# Altium PCB DC-DC_Isolation.PcbDoc
Units mm, origin at the board's own origin, x right, y up, seen from the top; angles counter-clockwise.
Board outline 75 x 57 mm, 2 copper layers (Top Layer, Bottom Layer), stack 0.871 mm thick; 96 components, 45 nets, 238 pads, 57 vias.
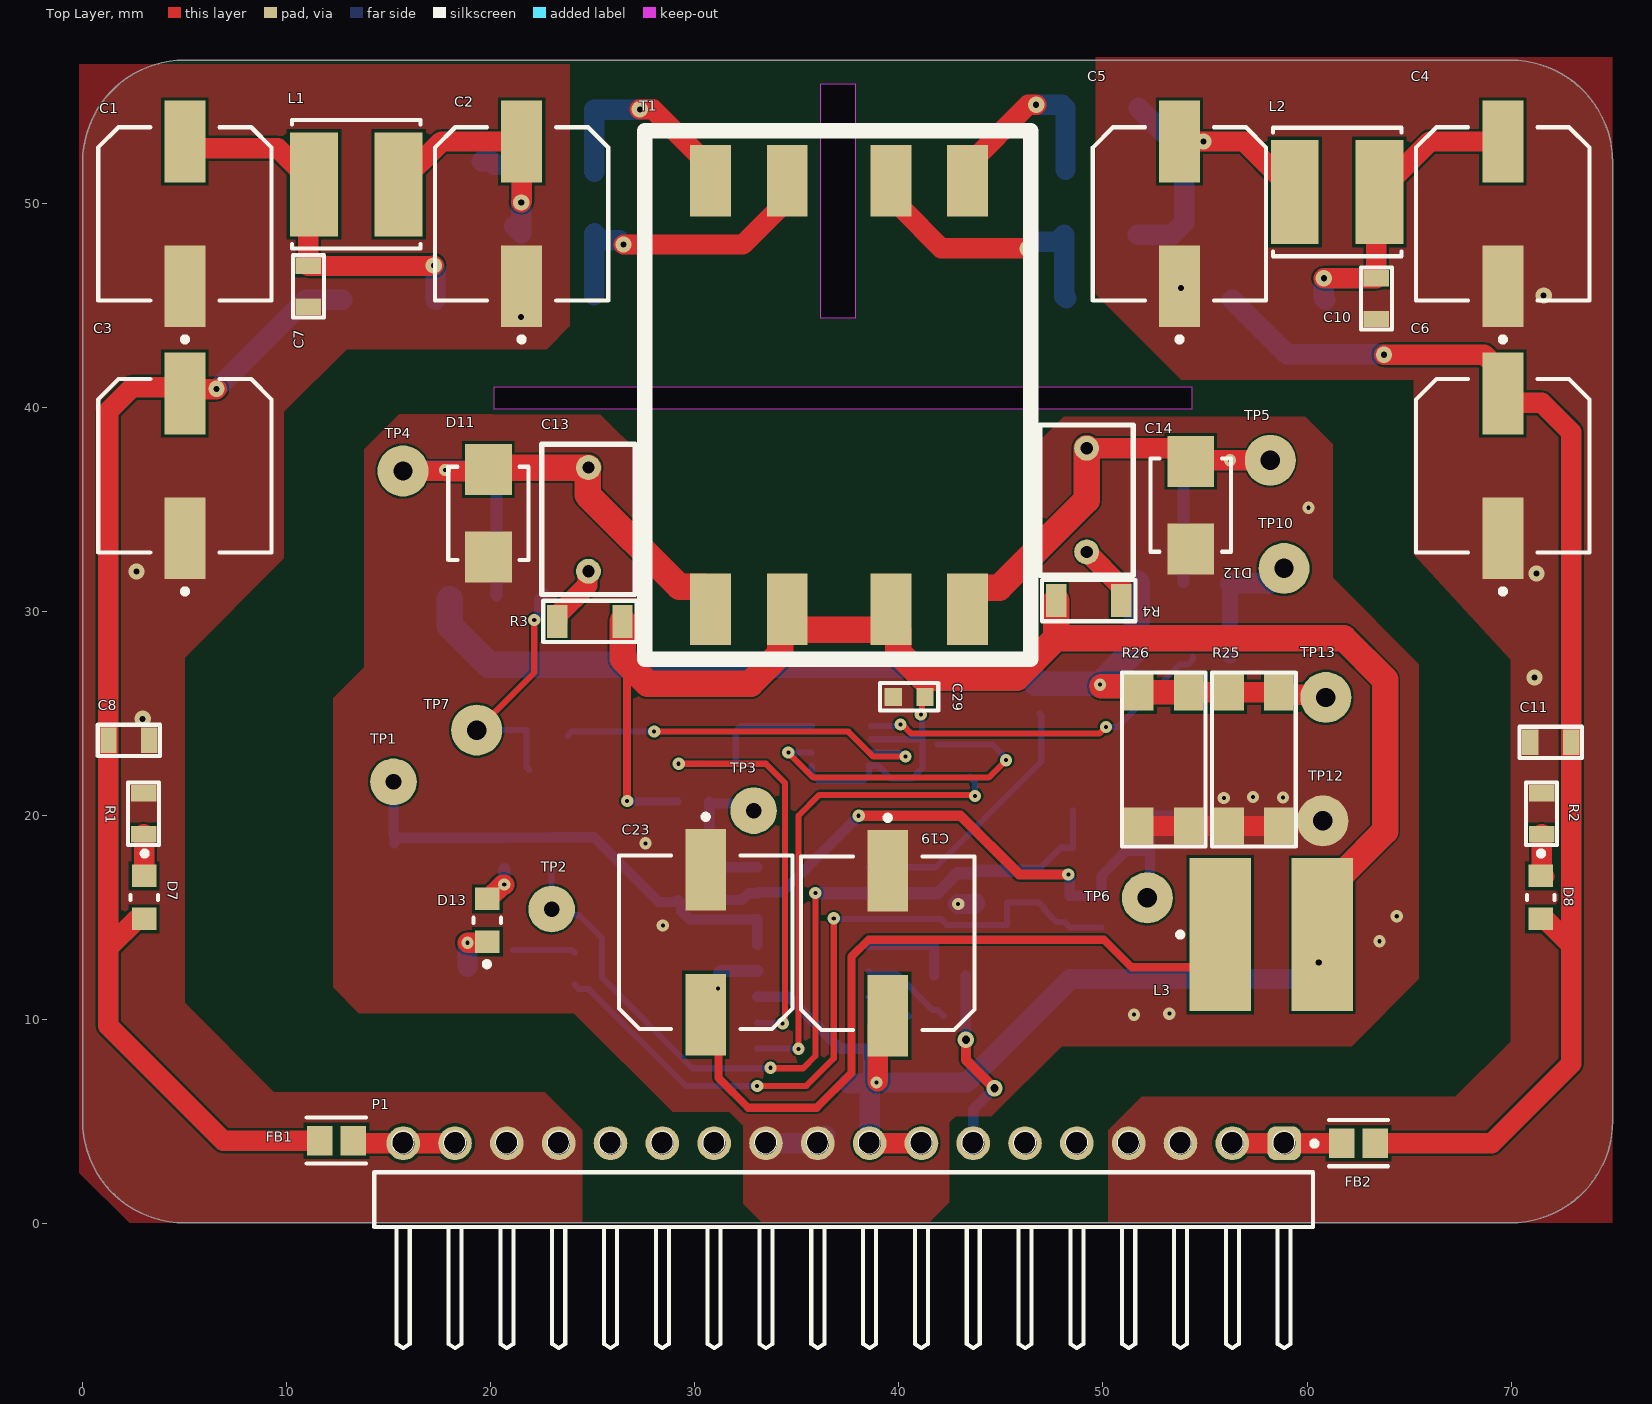
[diagram p0: Top Layer view]
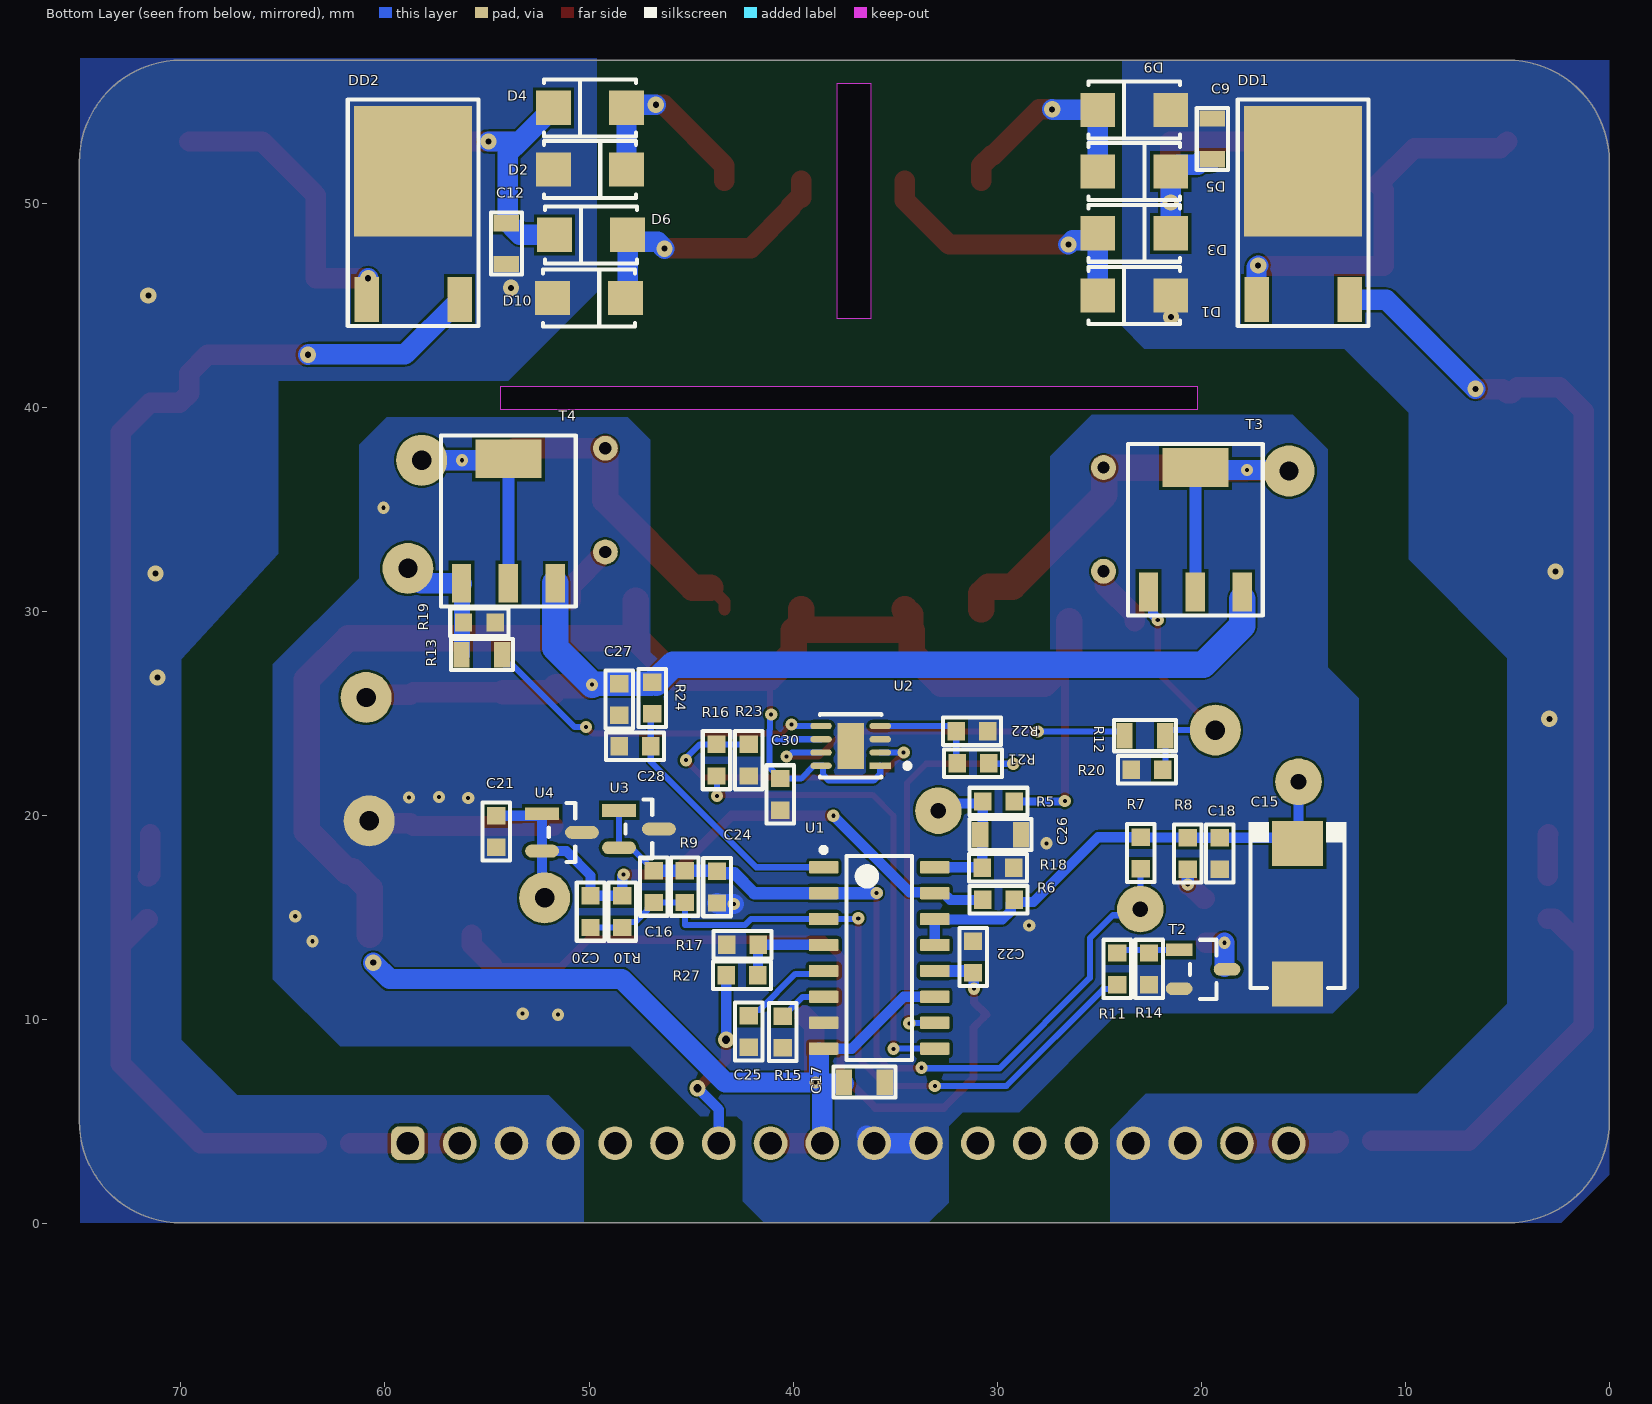
[diagram p1: Bottom Layer view, seen from below]
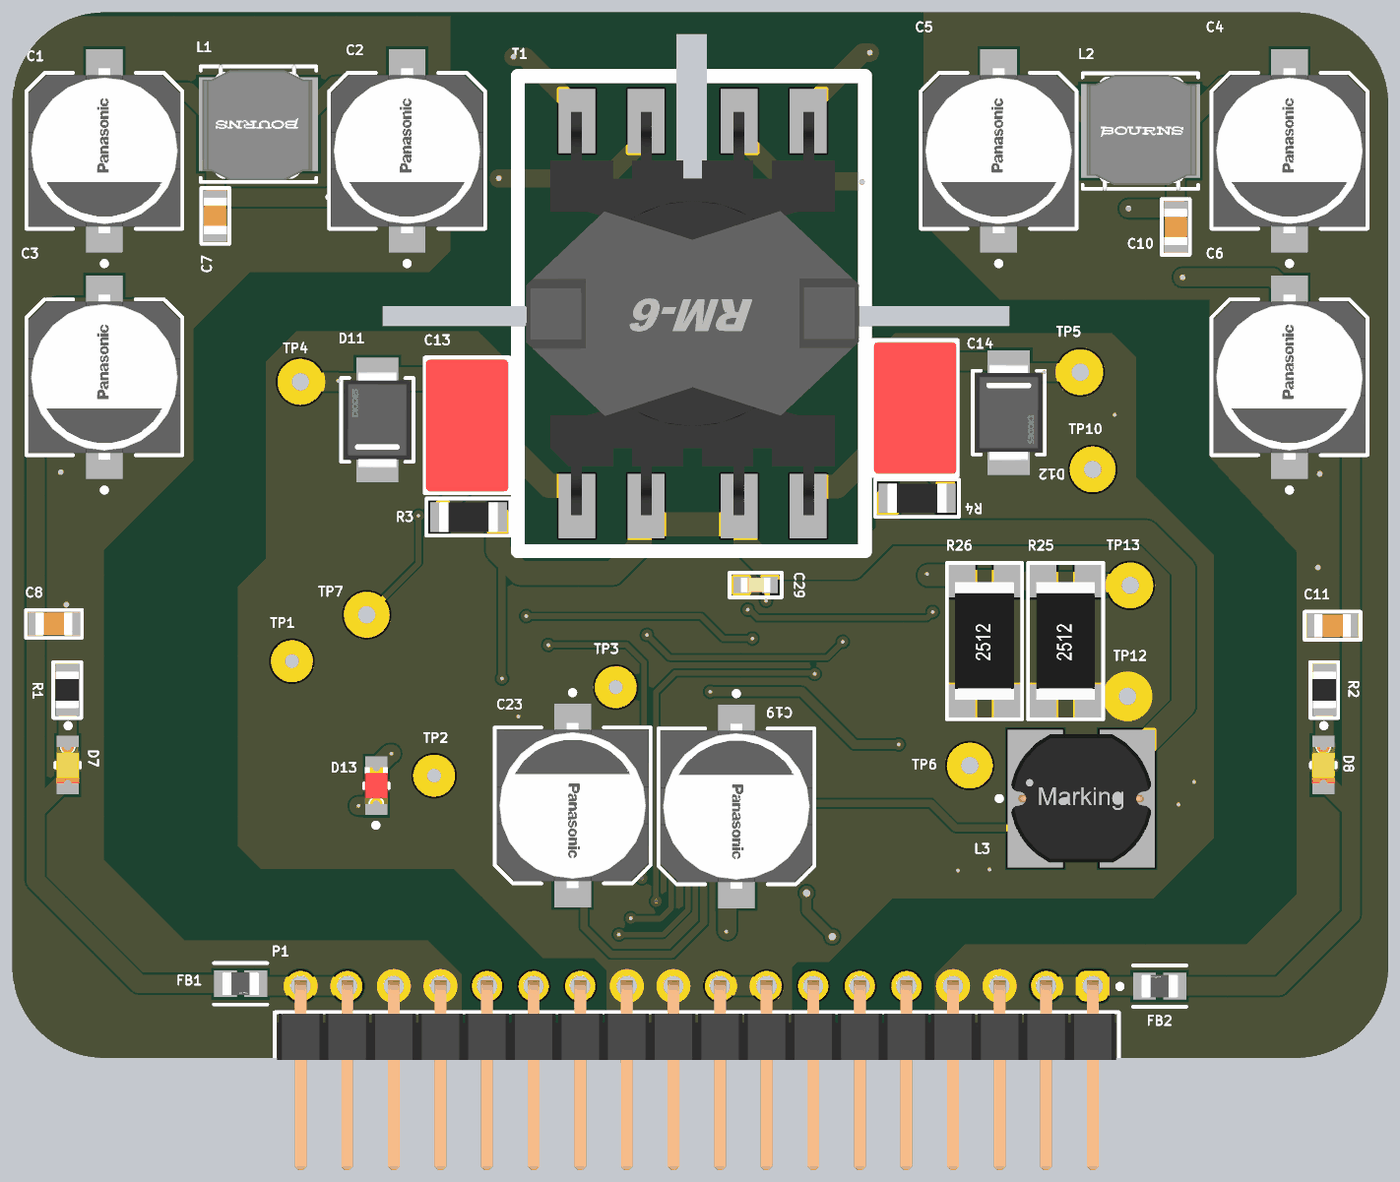
[diagram p2: 3D render of the assembled board from above, using the file's embedded part models]
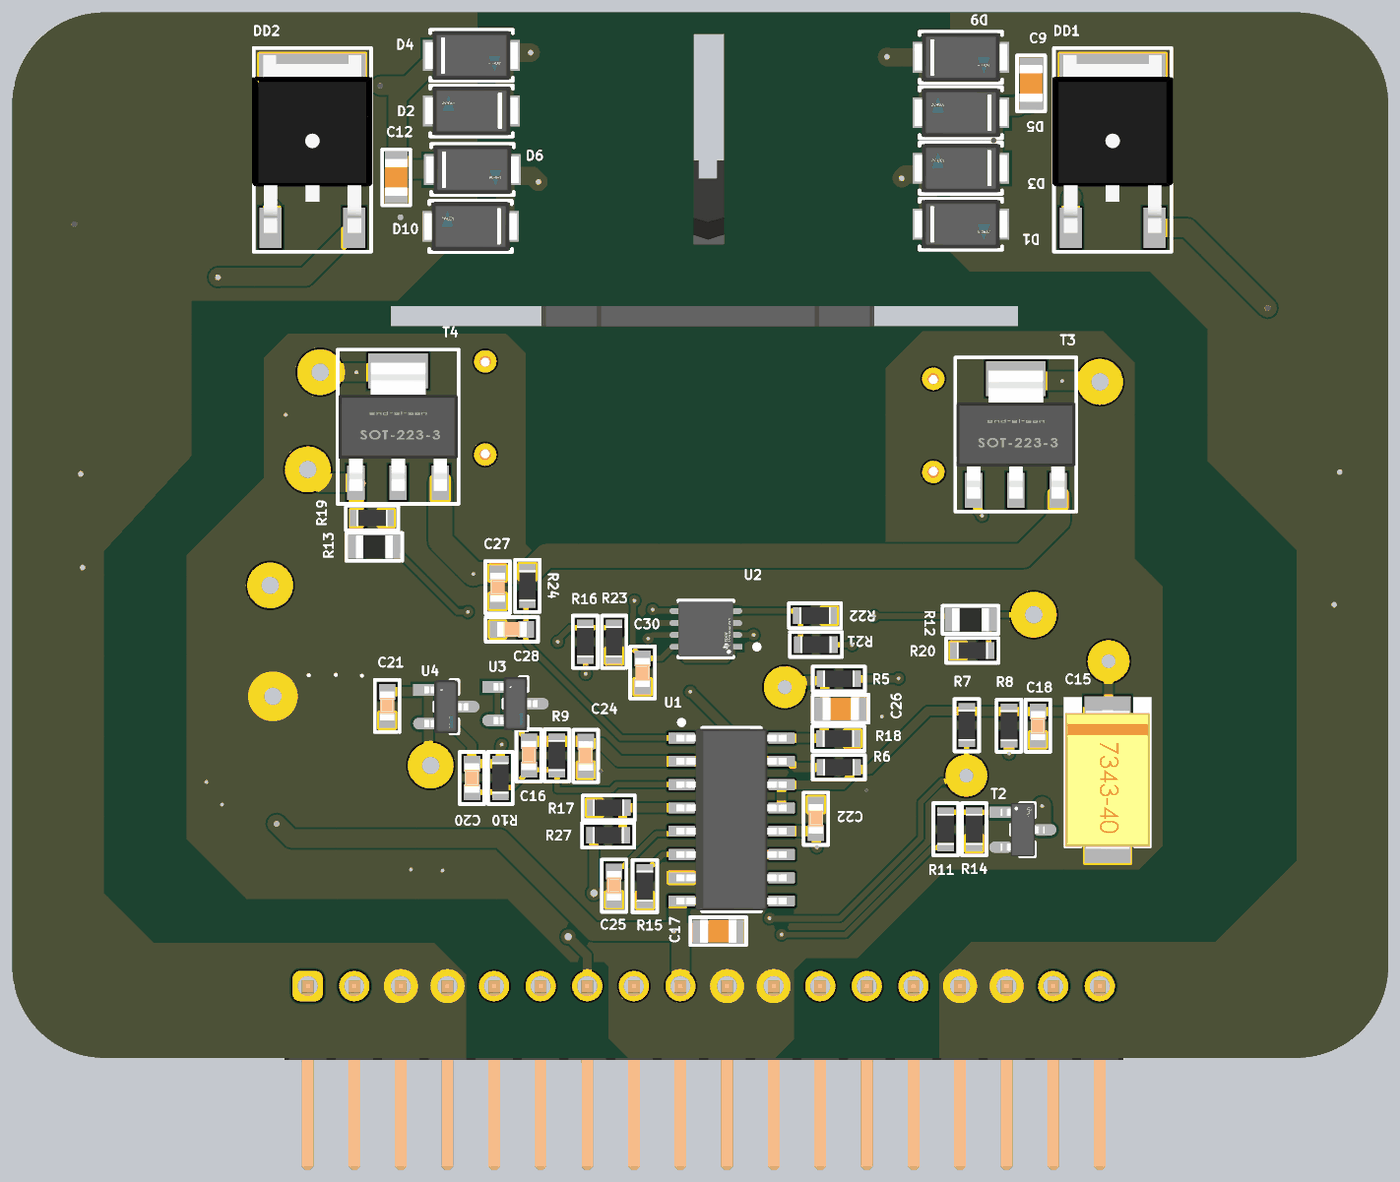
[diagram p3: 3D render of the assembled board from below, using the file's embedded part models]

## Layer stack, top to bottom
Top Solder: solder mask 0.0102, Solder Resist, Dk 3.5
Top Layer: signal copper 0.0356
Dielectric 1: dielectric 0.8, FR-4, Dk 4.8
Bottom Layer: signal copper 0.0356
Bottom Solder: solder mask 0.0102, Solder Resist, Dk 3.5

## Board outline
-0.019,5.04 -0.019,52.04 cw(c4.981,52.04) 4.981,57.04 69.981,57.04 cw(c69.981,52.04) 74.981,52.04 74.981,5.04 cw(c69.983,5.039) 69.981,0.04 4.981,0.04 cw(c4.98,5.039)
cut-out: 36.17,44.399 36.17,55.88 37.846,55.88 37.846,44.399
cut-out: 20.15,39.925 20.15,41.025 54.35,41.025 54.35,39.925

## Design rules (kind name [scope] priority, off if disabled: settings)
Clearance [All] p1: gap=0.254 ignorepadtopadclearanceinfootprint=FALSE except(0: Arc-Hole Track-Hole SMDPad-Hole THPad-Hole Via-Hole Fill-Hole Poly-Hole Region-Hole Text-Hole; 0.1: Arc-Poly Track-Poly THPad-Poly Via-Poly Fill-Poly Poly-Poly; 0.15: SMDPad-Poly)
Height [All] p1: minheight=0 maxheight=101.6 prefheight=12.7
PlaneConnect [All] p1: planeconnectstyle=Direct reliefexpansion=0.508 reliefentries=4 reliefconductorwidth=0.254 reliefairgap=0.254
PolygonConnect [All] p1: connectstyle=Direct reliefconductorwidth=0.254 reliefentries=4 polygonreliefangle="90 Angle" airgapwidth=0.254
RoutingVias [All] p1: holewidth=0.3 width=0.8 viastyle="Through Hole" minholewidth=0.2 minwidth=0.5 maxholewidth=0.4 maxwidth=1
SilkToSolderMaskClearance [IsPad] p1: minsilkscreentomaskgap=0.1 clearancetoexposedcopper=TRUE
SolderMaskExpansion [All] p1: expansion=0.102 istentingtop=FALSE
SupplyNets "Schematic Supply Nets_1" [InNet('GND')] p1: voltage=0.000
SupplyNets "Schematic Supply Nets" [InNet('VCC')] p2: voltage=0.000
Width [All] p1: maxlimit=3 minlimit=0.254 preferedwidth=0.5 minimp=50.000000 maximp=50.000000 favimp=50.000000
27 further rules are at their usual default settings.

## Components (designator, comment, footprint, x,y, rotation, side; value= is the part's Value field where it differs from the comment)
C1 "50V_100uF" CAP_SMD_Size_G 5,49.5 r90 top locked
C2 "50V_100uF" CAP_SMD_Size_G 21.5,49.5 r90 top locked
C3 "330uF_25V" CAP_SMD_Size_G 5,37.15 r90 top locked
C4 "50V_100uF" CAP_SMD_Size_G 69.6,49.5 r90 top locked
C5 "50V_100uF" CAP_SMD_Size_G 53.75,49.5 r90 top
C6 "330uF_25V" CAP_SMD_Size_G 69.6,37.15 r90 top locked
C7 "0.1uF" CAP-0805 11.05,45.95 r90 top
C8 "0.1uF" CAP-0805 2.25,23.7 r180 top
C9 "0.1uF" CAP-0805 19.45,53.175 r270 bottom
C10 "0.1uF" CAP-0805 63.4,45.35 r90 top
C11 "0.1uF" CAP-0805 71.95,23.6 r0 top
C12 "0.1uF" CAP-0805 54.05,48.05 r90 bottom
C13 "63V 0.01UF" FKP2D011001A00JSSD 24.775,34.525 r90 top
C14 "63V 0.01UF" FKP2D011001A00JSSD 49.2,35.475 r90 top
C15 "100uF_16V" CAP-TAN-D 15.275,15.2 r270 bottom
C16 "100nF" CAP-0603 46.825,16.525 r90 bottom
C17 "0.01uF" CAP-0805 36.5,6.942 r0 bottom
C18 "0.1uF" CAP-0603 19.075,18.15 r90 bottom
C19 "330uF_25V" CAP_SMD_Size_G 39.45,13.75 r270 top
C20 "100nF" CAP-0603 49.925,15.3 r270 bottom
C21 "100nF" CAP-0603 54.55,19.225 r90 bottom
C22 "0.01uF" CAP-0603 31.175,13.075 r270 bottom
C23 "470uF_25V" CAP_SMD_Size_G 30.525,13.8 r270 top
C24 "100nF" CAP-0603 43.725,16.5 r90 bottom
C25 "2.2nF" CAP-0603 42.175,9.425 r90 bottom
C26 "100nF" CAP-0805 29.825,19.075 r0 bottom
C27 "0.47uF" CAP-0603 48.525,25.7 r90 bottom
C28 "470 pF" CAP-0603 47.75,23.4 r180 bottom
C29 "0.1uF" CAP-0603 40.5,25.825 r0 top
C30 "0.01uF" CAP-0603 40.625,21.05 r90 bottom
D1 "ES1D-M3" FP-SMA-MFG 23.275,45.5 r180 bottom
D2 "ES1D-M3" FP-SMA-MFG 49.95,51.675 r0 bottom
D3 "ES1D-M3" FP-SMA-MFG 23.275,48.55 r0 bottom
D4 "ES1D-M3" FP-SMA-MFG 49.95,54.7 r180 bottom
D5 "ES1D-M3" FP-SMA-MFG 23.275,51.575 r0 bottom
D6 "ES1D-M3" FP-SMA-MFG 49.9,48.475 r180 bottom
D7 "LED_GREEN" LED_GREEN 3,16 r270 top locked
D8 "LED_GREEN" LED_GREEN 71.45,16 r270 top locked
D9 "ES1D-M3" FP-SMA-MFG 23.275,54.6 r180 bottom
D10 "ES1D-M3" FP-SMA-MFG 50,45.375 r0 bottom
D11 "SMBJ33CA-13-F" FP-SMB-CA-MFG 19.875,34.825 r90 top
D12 "SMBJ33CA-13-F" FP-SMB-CA-MFG 54.3,35.225 r270 top
D13 "LED_RED" LED_RED 19.825,14.875 r90 top
DD1 "LM7818" TO-252 15,49.5 r180 bottom locked
DD2 "LM7818" TO-252 58.625,49.5 r180 bottom locked
FB1 "BLM21PG221SN1D" FP-BLM21-0_2-t0_85-e0_5-IPC_B 12.425,4.075 r0 top
FB2 "BLM21PG221SN1D" FP-BLM21-0_2-t0_85-e0_5-IPC_B 62.524,3.95 r180 top
L1 "SRN6045TA-220M" FP-SRN6045TA-MFG 13.4,50.95 r180 top
L2 "SRN6045TA-220M" FP-SRN6045TA-MFG 61.475,50.575 r0 top
L3 "330µH, 0.38A" WE-PD2_7850 58.25,14.175 r0 top
P1 "61301811021" 61301811021 37.29,1.18 r0 top
R1 "10K" RES-0805 2.975,20.1 r270 top
R2 "10K" RES-0805 71.5,20.1 r270 top
R3 "10 OMH" RES-1206 24.85,29.525 r180 top
R4 "10 OMH" RES-1206 49.3,30.55 r180 top
R5 "10K" RES-0603 29.925,20.7 r180 bottom
R6 "2K" RES-0603 29.925,15.875 r180 bottom
R7 "2K" RES-0603 22.95,18.175 r90 bottom
R8 "820" RES-0603 20.65,18.15 r90 bottom
R9 "200K" RES-0603 45.3,16.525 r90 bottom
R10 "200K" RES-0603 48.375,15.3 r270 bottom
R11 "1K" RES-0603 24.1,12.5 r270 bottom
R12 "10" RES-0805 22.75,23.925 r180 bottom
R13 "10" RES-0805 55.25,27.9 r0 bottom
R14 "10K" RES-0603 22.55,12.5 r90 bottom
R15 "6.2K" RES-0603 40.5,9.4 r90 bottom
R16 "10" RES-0603 43.75,22.725 r90 bottom
R17 "10K" RES-0603 42.475,13.675 r180 bottom
R18 "2K" RES-0603 29.95,17.45 r0 bottom
R19 "1K" RES-0603 55.375,29.475 r0 bottom
R20 "1K" RES-0603 22.65,22.25 r180 bottom
R21 "10" RES-0603 31.175,22.575 r0 bottom
R22 "1K" RES-0603 31.225,24.15 r0 bottom
R23 "1K" RES-0603 42.175,22.725 r90 bottom
R24 "1K" RES-0603 46.9,25.775 r90 bottom
R25 "1" RES-2512 57.4,22.775 r90 top
R26 "1" RES-2512 52.975,22.775 r90 top
R27 "1K" RES-0603 42.5,12.175 r0 bottom
T1 "RM-6" TRANS_RM6 37.065,40.625 r90 top
T2 "BC847C" SOT23-3_IPC_A 19.9,12.475 r180 bottom
T3 "IRFL024ZTRPBF" SOT-223-3 20.275,34.025 r180 bottom
T4 "IRFL024ZTRPBF" SOT-223-3 53.95,34.45 r180 bottom
TP1 "Test_Point_PCB" Test_Point#1 15.222,21.666 r0 top
TP2 "Test_Point_PCB" Test_Point#1 22.975,15.425 r0 top
TP3 "Test_Point_PCB" Test_Point#1 32.875,20.25 r0 top locked
TP4 "" Test_Point#2 15.687,36.9 r0 top
TP5 "" Test_Point#2 58.2,37.425 r0 top
TP6 "" Test_Point#2 52.175,15.975 r0 top
TP7 "" Test_Point#2 19.3,24.2 r0 top
TP10 "" Test_Point#2 58.875,32.125 r90 top
TP12 "" Test_Point#2 60.775,19.75 r90 top
TP13 "" Test_Point#2 60.925,25.8 r90 top
U1 "TL494CDR" D0016A_N 35.775,13.03 r180 bottom
U2 "UCC27524DSDR" FP-DSD0008D-IPC_A 37.175,23.425 r0 bottom
U3 "TL431" TL431_SOT-23-3(A) 47.552,19.35 r180 bottom
U4 "TL431" TL431_SOT-23-3(A) 51.323,19.185 r180 bottom

## Footprints (in the part's own frame and the unit in brackets; to place one, negate y for a bottom-side part, rotate by r counter-clockwise, add the part's x,y. Pads: shape width x height; smd on the part's side, far side on the other; paste and mask are expansions set on the pad)
61301811021 [mm] "Pin Header, pitch 2.54 mm, THT, Angled, single row, 18p"
  rrect50% 1.65x1.65 hole 1.1: 1(21.59,2.77)
  round 1.65 hole 1.1: 2(19.05,2.77) 3(16.51,2.77) 4(13.97,2.77) 5(11.43,2.77) 6(8.89,2.77) 7(6.35,2.77) 8(3.81,2.77) 9(1.27,2.77) 10(-1.27,2.77) 11(-3.81,2.77) 12(-6.35,2.77) 13(-8.89,2.77) 14(-11.43,2.77) 15(-13.97,2.77) 16(-16.51,2.77) 17(-19.05,2.77) 18(-21.59,2.77)
  silkscreen extent -23.01,-7.27 23.2,2.87, body extent -22.86,-7.27 22.86,3.09, height 2.58
CAP-0603 [mm]
  rect 0.85x0.9 smd: 1(-0.775,0) 2(0.775,0)
  silkscreen extent -1.43,-0.67 1.43,0.67, body extent -0.8,-0.4 0.8,0.4, height 0.8
CAP-0805 [mm]
  rect 0.8x1.25 smd mask+0.015: 1(-1,0) 2(1,0)
  silkscreen extent -1.52,-0.76 1.52,0.76, body extent -1,-0.62 1,0.63, height 0.8
CAP-TAN-D [mm]
  rect 2.2x2.5 smd: 1(-3.45,0) 2(3.45,0)
  silkscreen extent -4.5,-2.4 3.65,2.4, body extent -3.8,-2.3 3.8,2.3, height 4
CAP_SMD_Size_G [mm]
  rect 4x2 smd paste+0 mask+0: 1(3.55,0) 2(-3.55,0)
  silkscreen extent -6.27,-4.25 4.25,4.25, body extent -5.8,-4.5 5.8,4.5, height 0.25
D0016A_N [mm] "SOIC, 16-Leads, Body 10x4mm, Pitch 1.27mm, IPC Medium Density"
  rrect17% 1.45x0.6 smd: 1(-2.725,4.445) 2(-2.725,3.175) 3(-2.725,1.905) 4(-2.725,0.635) 5(-2.725,-0.635) 6(-2.725,-1.905) 7(-2.725,-3.175) 8(-2.725,-4.445) 9(2.725,-4.445) 10(2.725,-3.175) 11(2.725,-1.905) 12(2.725,-0.635) 13(2.725,0.635) 14(2.725,1.905) 15(2.725,3.175) 16(2.725,4.445)
  silkscreen extent -2.85,-5 1.6,5.42, body extent -3,-4.95 3,4.95, height 1.59
FKP2D011001A00JSSD [mm] "FKP2D011001A00JSSD"
  round 1.224 hole 0.6: 1(-2.54,0) 2(2.54,0)
  silkscreen extent -3.68,-2.29 3.68,2.29, body extent -3.6,-2.25 3.6,2.25, height 6
FP-BLM21-0_2-t0_85-e0_5-IPC_B [mm]
  rect 1.255x1.456 smd paste+0 mask+0: 1(-0.826,0) 2(0.826,0)
  silkscreen extent -1.45,-1.13 1.45,1.13, body extent -1.7,-0.98 1.7,0.98, height 0.25
FP-DSD0008D-IPC_A [mm]
  rect 1.057x0.309 smd paste+0 mask+0: 1(-1.451,0.975)
  rrect100% 1.057x0.309 smd paste+0 mask+0: 2(-1.451,0.325) 3(-1.451,-0.325) 4(-1.451,-0.975) 5(1.451,-0.975) 6(1.451,-0.325) 7(1.451,0.325) 8(1.451,0.975)
  rect 1.3x2.25 smd paste-1000 mask+0: 9(0,0)
  silkscreen extent -2.9,-1.55 1.5,1.55, body extent -1.5,-1.5 1.5,1.5, height 0.8
FP-SMA-MFG [mm]
  rect 1.7x1.68 smd paste+0 mask+0: 1(-1.79,0) 2(1.79,0)
  silkscreen extent -2.25,-1.4 2.25,1.4, body extent -2.55,-1.33 2.55,1.33, height 2.29
FP-SMB-CA-MFG [mm]
  rect 2.5x2.3 smd paste+0 mask+0: 1(-2.15,0) 2(2.15,0)
  silkscreen extent -2.28,-1.97 2.28,1.97, body extent -3.5,-2.07 3.5,2.07, height 0.25
FP-SRN6045TA-MFG [mm]
  rect 2.35x5.1 smd paste+0 mask+0: 1(-2.075,0) 2(2.075,0)
  silkscreen extent -3.15,-3.15 3.15,3.15, body extent -3.35,-3.25 3.35,3.25, height 0.25
LED_GREEN [mm]
  rect 1.1x1.2 smd paste+0 mask+0: 1(1.05,0) 2(-1.05,0)
  silkscreen extent -2.27,-0.67 0.13,0.67, body extent -1,-0.63 1,0.63, height 0.8
LED_RED [mm]
  rect 1.1x1.2 smd paste+0 mask+0: 1(1.05,0) 2(-1.05,0)
  silkscreen extent -2.27,-0.67 0.13,0.67, body extent -1.7,-0.77 1.7,0.77, height 0.25
RES-0603 [mm]
  rect 0.85x0.9 smd: 1(-0.775,0) 2(0.775,0)
  silkscreen extent -1.43,-0.67 1.43,0.67, body extent -0.85,-0.45 0.85,0.45, height 0.55
RES-0805 [mm]
  rect 0.8x1.25 smd mask+0.015: 1(-1,0) 2(1,0)
  silkscreen extent -1.52,-0.76 1.52,0.76, body extent -1,-0.62 1,0.63, height 0.6
RES-1206 [mm]
  rect 1x1.6 smd: 1(-1.6,0) 2(1.6,0)
  silkscreen extent -2.29,-1.02 2.29,1.02, body extent -1.6,-0.8 1.6,0.8, height 0.6
RES-2512 [mm]
  rect 1.8x1.45 smd: 1(-3.275,-1.225) 1(-3.275,1.225) 2(3.275,-1.225) 2(3.275,1.225)
  silkscreen extent -4.28,-2.05 4.25,2.05, body extent -3.2,-1.6 3.2,1.6, height 0.6
SOT23-3_IPC_A [mm]
  rect 1.308x0.616 smd paste+0 mask+0: 1(-1.175,0.95)
  rrect100% 1.308x0.616 smd paste+0 mask+0: 2(-1.175,-0.95) 3(1.175,0)
  silkscreen extent -0.65,-1.45 0.65,1.45, body extent -1.2,-1.45 1.2,1.45, height 1.1
SOT-223-3 [mm]
  rect 0.95x1.9 smd: 1(-2.3,-3.05) 2(0,-3.05) 3(2.3,-3.05)
  rect 3.25x1.9 smd: 2(0,3.05)
  silkscreen extent -3.3,-4.2 3.3,4.2, body extent -3.25,-3.5 3.25,3.5, height 1.7
Test_Point#1 [mil]
  round 90 hole 30 paste-99999 mask+4: 1(0,0)
Test_Point#2 [mil]
  round 98.43 hole 37.4: 1(0,0)
TL431_SOT-23-3(A) [mm]
  rect 1.659x0.627 smd paste+0 mask+0: 1(-0.977,0.915)
  rrect100% 1.659x0.627 smd paste+0 mask+0: 2(-0.977,-0.915) 3(0.977,0)
  silkscreen extent -0.65,-1.45 0.65,1.45, body extent -1.2,-1.45 1.2,1.45, height 1.1
TO-252 [mm]
  rect 1.2x2.2 smd: 1(-2.28,-4.2) 3(2.28,-4.2)
  rect 5.8x6.4 smd: 2(0,2.1)
  silkscreen extent -3.2,-5.5 3.2,5.6, body extent -3.29,-4.47 3.29,5.23, height 2.3
TRANS_RM6 [mm]
  rect 3.5x2 smd: 1(-10.5,6.3) 2(-10.5,2.54) 3(-10.5,-2.54) 4(-10.5,-6.3) 5(10.5,-6.3) 6(10.5,-2.54) 7(10.5,2.54) 8(10.5,6.3)
  silkscreen extent -12.95,-9.4 12.95,9.53, body extent -11,-9.08 11,9.08, height 12.68
WE-PD2_7850 [mm] "SMD Power Inductor, 2-Leads, body 7.8x7mm"
  rect 3x7.5 smd: 1(-2.5,0) 2(2.5,0)
  silkscreen extent -4.59,-0.12 -4.34,0.12, body extent -3.81,-3.5 3.81,3.5, height 4.95

## Part data
C1 C2 C3 C4 C5 C6 C15 C19 C23: library part CAP-POLAR
C7 C9 C10 C12: library part CAP-NON-POLAR, "0.1uF X7R"
C8 C11 C16 C17 C18 C20 C21 C22 C24 C25 C26 C27 C28 C29 C30: library part CAP-NON-POLAR
C13 C14: library part CAP-NON-POLAR, "WIMA Film Capacitor FKP2 63V 0.01UF"
D7 D8 D13: library part LED, Manufacturer_Name="Wurth Elektronik", Manufacturer_Part_Number=151031YS06000, Mouser Part Number=710-151031YS06000, Datasheet Link=https://katalog.we-online.de/led/datasheet/151031YS06000.pdf, Geometry.Height=5.5mm, Mouser Price/Stock=https://www.mouser.co.uk/ProductDetail/Wurth-Elektronik/151031YS06000?qs=LlUlMxKIyB3xSYYW%252BcuBiQ%3D%3D
D11 D12: "TVS DIODE 33V 53.3V SMB"
FB1 FB2: library part CMP-0686-00610-3, "Chip Ferrite Bead, 0805, 220Ω @ 100MHz, 0.045Ω, 25%, 2A", Case Code (Imperial)=0805, Case Code (Metric)=2012, Current=2A, DC Resistance (DCR)=45mR, Frequency=100MHz, Max Operating Temperature=125°C, Min Operating Temperature=-55°C, Package Quantity=1, Tolerance=25%, Case/Package=0805, Contact Plating=Tin, Core Material=Ferrite, Current Rating=2A, DC Current=2A, DC Resistance-Max=45mR, Depth=1.25mm, Height=0.85mm, Impedance=220R, Lead Free="Lead Free", Length=2mm, Material=Ferrite, Max Current Rating=2A, Max DC Current=2A, Military Standard=Not, Number of Circuits=1, Number of Lines=1, Number of Pins=2, Packaging="Tape and Reel", Radiation Hardening=No, REACH SVHC="No SVHC", RoHS Compliant=Yes, Series=BLM21P, Shielding=Unshielded, Termination=SMD/SMT, Test Frequency=100MHz, Width=1.25mm
L1 L2: library part CMP-07248-000061-1, "FIXED IND 22UH 2.3A 96 MOHM SMD", DC Resistance (DCR)=96mR, Inductance=22uH, Inductance Tolerance=20%, RMS Current (Irms)=2.3A, Saturation Current=3.3A, Mount="Surface Mount", Packaging="Cut Tape", REACH SVHC="No SVHC", RoHS Compliant=Yes
L3: library part 744775239, "WE-PD2 SMT Power Inductor, size 7850, 390µH, 0.38A, 1.77Ω", Case/Size Code=7850, DC Resistance=1.151Ω, DC Resistance Max=1.77Ω, Inductance=390µH, Manufacturer="Wurth Elektronik", Operating Temperature Max=125°C, Operating Temperature Min=-40°C, Rated Current=0.38A, Saturation Current=0.43A, Self Resonant Frequency=3.9MHz, Category="Unshielded Power Inductors", ComponentLink1Description="Website Link", ComponentLink1URL=https://www.we-online.com/redexpert/article/744775239?ad, ComponentLink2Description="Datasheet Link", ComponentLink2URL=https://www.we-online.com/redexpert/spec/744775239?ad, Height=4.95mm, Length=7.8mm, Manufacturer Part Number=744775239, Match Code=WE-PD2, Mount="Surface Mount", Packaging="Tape and Reel", Width=7mm, Simulation ModelName=7850_744775239_390u, Simulation ModelText=".subckt 7850_744775239_390u 1 2 / Rp 1 2 180000 / Cp 1 2 5p / Rs 1 N3 1.151 / L1 N3 2 390u / .ends 7850_744775239_390u", Simulation PortMap=(1:1),(2:2)
P1: "WR-PHD Pin Header, THT, Angled, pitch 2.54mm, 1 Row, 18P", Contact Resistance=20mOhm, Manufacturer="Wurth Elektronik", Operating Temperature Max=105°C, Operating Temperature Min=-40°C, Rated Current=3A, Withstanding Voltage=500V, Working Voltage=250V, Category="Board-to-Board Connectors", ComponentLink1Description="Website Link", ComponentLink1URL=https://www.we-online.com/redexpert/article/61301811021?ad, ComponentLink2Description="Datasheet Link", ComponentLink2URL=https://www.we-online.com/redexpert/spec/61301811021?ad, Gender="Pin Header", Manufacturer Part Number=61301811021, Match Code=WR-PHD, Mount="Through Hole", Number of Pins=18, Number of Rows=1, Orientation=Angled, Packaging=Bag, Pitch=2.54mm
R1 R2 R3 R4 R5 R6 R7 R8 R9 R10 R11 R12 R13 R14 R15 R16 R17 R18 R19 R20 R21 R22 R23 R24 R25 R26 R27: library part RES-CONST
T1: library part RM_6_12-12-18-18
TP1 TP2 TP3 TP4 TP5 TP6 TP7 TP10 TP12 TP13: library part TP_PCB?, "Test_Point"
U1: library part CMP-0319-00950-2, "Pulse-Width-Modulation Control Circuit with Voltage Control, 45 % Duty Cycle, 0 to +70 degC, 16-pin SOIC (D), Green (RoHS & no Sb/Br)", Frequency(Max)(kHz)=300, Manufacturer="Texas Instruments", Rating=Military, Code_JEDEC=MS-012AC, ComponentLink1Description=Datasheet, ComponentLink1URL=http://www.ti.com/general/docs/lit/getliterature.tsp?genericPartNumber=TL494&fileType=pdf, Control Method=Voltage, DatasheetVersion=SLVS074E, Duty Cycle(Max)(%)=45, Eco-Plan="Green (RoHS & no Sb/Br)", Mounting Technology="Surface Mount", PackageDescription="16-Pin Plastic Small Outline Integrated Circuit, 9.9 x 3.9 mm, Pitch 1.27 mm Pitch", PackageReference=D0016A, PackageVersion="revM, Jun-2011", PartNumber=TL494CDR, Regulated Outputs(#)=2, SubFamily="PWM Controller", Topology="Boost, Buck, Flyback, Forward, Full-Bridge, Half-Bridge, Push-Pull"
U2: "IC GATE DVR LO-SIDE DL 5A 8SON"
U3 U4: library part TL431_SOT-23-3, "TL431_SOT-23-3"

## Via types
v1: diameter 0.6, hole 0.2, Top Layer to Bottom Layer, tented both sides, 37 vias
v2: diameter 0.8, hole 0.3, Top Layer to Bottom Layer, tented both sides, 18 vias
v3: diameter 0.8, hole 0.4, Top Layer to Bottom Layer, tented both sides, 2 vias

## Nets (pads, with @x,y where several pads share a name; then routed paths per layer and width w, separated by ;. In a path a pad name is that pad's centre, name@x,y a point inside that pad or via, vN(x,y) a via of type N, cw(c..) or ccw(c..) an arc to the next point about the centre after c; other vN are vias at no path point)
GND: C15.2 C17.1 C18.1 C19.2 C21.1 C22.1 C23.2 C24.1 C25.1 C26.1 C27.1 C28.1 C29.1 C30.1 D11.1 D12.2 P1.10 P1.11 R14.1 R15.1 R17.1 R18.1 R19.1 R20.1 R22.1 R23.1 R25.1 R26.1 T2.2 TP12.1 U1.7 U2.3 U2.9 U3.3 U4.3 | length 13.1
  Top Layer w1: R26.1@51.75,19.5 58.625,19.5 58.75,19.625 60.65,19.625 TP12.1
  Bottom Layer w1: P1.11 P1.10 P1.10@36.4,4.33 ; v1(42.9,15.675) 43.675,15.675 C24.1
  other v1: 51.525,10.25 53.25,10.3 63.55,13.85 28.425,14.625 64.4,15.075 27.575,18.65 55.925,20.875 58.825,20.9 57.35,20.925 60.075,35.1
NetC1_1: C1.1 C7.2 DD1.1 L1.2 | length 19.2
  Top Layer w1: C1.1 5.325,52.725 9.55,52.725 L1.2 11.05,50.675 C7.2 17.175,46.95 v2(17.2,46.975)
  Bottom Layer w1: v2(17.2,46.975) 17.28,46.895 DD1.1
NetC1_2: C1.2 C2.2 C3.2 C7.1 C8.1 C9.1 D1.2 D9.2 DD1.2 P1.15 P1.16 R1.1
  other v2: 2.925,24.75 2.625,31.975 21.475,44.45
NetC2_1: C2.1 C9.2 D3.1 D5.1 L1.1 | length 15.6
  Top Layer w1: L1.1 17.575,53.05 C2.1 21.5,50.125 21.475,50.1 21.475,50.073 v2(21.485,50.063)
  Bottom Layer w1: C9.2@19.55,52.075 20.009,52.075 20.169,51.915 21.145,51.915 D5.1 v2(21.485,50.063) D3.1 21.475,48.55 D3.1@21.135,48.89
NetC3_1: C3.1 C8.2 D7.1 DD1.3 FB1.1 | length 59.1
  Top Layer w1: D7.1 2.675,14.95 1.25,13.525 ; v2(6.55,40.925) 6.525,40.9 5.2,40.9 C3.1 4.8,40.7 4.5,41 2.417,41 1.25,39.833 1.25,13.525 ; FB1.1 6.875,4.075 1.25,9.7 1.25,13.525
  Bottom Layer w1: v2(6.55,40.925) 10.925,45.3 DD1.3
NetC4_1: C4.1 C10.2 DD2.1 L2.2 | length 15
  Top Layer w1: v2(60.825,46.35) C10.2 63.4,50.425 L2.2 66.025,53.05 C4.1
  Bottom Layer w1: v2(60.825,46.35) 60.825,45.38 DD2.1
NetC4_2: C4.2 C5.2 C6.2 C10.1 C11.1 C12.1 D2.2 D10.2 DD2.2 P1.3 P1.4 R2.1
  other v2: 71.15,26.775 71.25,31.875 71.6,45.5 53.825,45.875
NetC5_1: C5.1 C12.2 D4.1 D6.1 L2.1 | length 17
  Top Layer w1: C5.1 v2(54.925,53.05) 56.925,53.05 L2.1
  Bottom Layer w1: D6.1 52.026,48.475 52.04,48.489 53.389,48.489 C12.2@53.775,48.875 ; D4.1 53.39,53.05 ; C12.2@53.975,49.075 53.975,52.465 53.39,53.05 ; v2(54.925,53.05) 53.39,53.05
NetC6_1: C6.1 C11.2 D8.1 DD2.3 FB2.1 | length 63.9
  Top Layer w1: FB2.1 69.05,3.95 72.95,7.85 C11.2 72.95,38.8 71.514,40.236 70.064,40.236 C6.1 69.6,41.7 68.7,42.6 v2(63.775,42.6) ; D8.1@71.625,14.925 71.675,14.925 72.945,13.655
  Bottom Layer w1: DD2.3 59.02,42.625 63.75,42.625 v2(63.775,42.6)
NetC13_1: C13.1 R3.2 | length 3.1
  Top Layer w1: R3.2 23.25,29.825 24.732,31.307 24.732,31.942 C13.1
NetC13_2: C13.2 D11.2 T1.1 T3.2 TP4.1 | length 29.6
  Top Layer w0.6: v1@17.7,36.9 v1(17.75,36.95)
  Top Layer w1: TP4.1@15.45,36.9 TP4.1 v1@17.7,36.9 ; v1@17.811,36.889 19.789,36.889 D11.2
  Top Layer w1.3: D11.2@19.965,37.065 C13.2 ; C13.2@24.735,37.025 24.735,35.731 29.241,31.225 30.415,31.225 30.765,30.875 T1.1
  Bottom Layer w0.6: T3.2@20.275,30.798 20.275,30.975 T3.2@20.275,37.075
  Bottom Layer w1: TP4.1@15.687,36.95 v1(17.75,36.95) T3.2@19.725,36.95
NetC14_1: C14.1 R4.1 | length 3.1
  Top Layer w1: C14.1 50.9,31.235 R4.1
NetC14_2: C14.2 D12.1 T1.4 T4.2 TP5.1 | length 30.1
  Top Layer w0.6: T1.4 43.365,30.489 T1.4@44.065,31.189 ; D12.1 D12.1@54.35,37.425
  Top Layer w1: C14.2@49.261,38.015 53.66,38.015 D12.1 ; D12.1@54.35,37.425 v1(56.225,37.425) TP5.1
  Top Layer w1.3: T1.4@44.065,31.189 44.914,31.189 49.2,35.475 C14.2
  Bottom Layer w0.6: T4.2@53.95,31.47 T4.2@53.95,37.5
  Bottom Layer w1: T4.2@54.025,37.425 v1(56.225,37.425) TP5.1@58.1,37.425
NetC15_1: C15.1 C18.2 R6.2 R7.2 R8.2 TP1.1 U1.13 U1.14 | length 23.9
  Bottom Layer w0.5: TP1.1 15.222,19.07 C15.1@15.268,19.024 ; C15.1 15.275,18.925 R8.2 20.663,18.938 22.938,18.938 R7.2 ; R7.2@22.975,18.95 25.05,18.95 28.225,15.775 29.05,15.775 R6.2 29.325,15.7 29.325,15.325 29.729,14.921 33.036,14.921 U1.14 ; U1.14@33,14.935 U1.14@33.05,14.885 ; U1.13 U1.14@33.05,14.825
NetC16_1: C16.1 C20.2 R9.1 R10.2 R11.2 U1.3 | length 37.1
  Top Layer w0.3: v1(33.05,6.76) 35.46,6.76 36.804,8.104 v1(36.804,14.975)
  Bottom Layer w0.3: R11.2 24.32,11.505 24.791,11.505 29.536,6.76 v1(33.05,6.76) ; v1(36.804,14.975) 36.831,14.975 36.871,14.935 42.065,14.935 42.35,14.65 45.3,14.65 R9.1 46.85,15.75 47.125,15.475 47.125,15.384 47.724,14.785 48.115,14.785 R10.2 C20.2
NetC16_2: C16.2 C24.2 R7.1 R9.2 TP2.1 U1.2 U3.1 U3.2 | length 42.9
  Top Layer w0.3: v1(33.7,7.65) 33.725,7.625 35.3,7.625 35.9,8.225 v1(35.9,16.215)
  Bottom Layer w0.3: R7.1 22.975,17.375 TP2.1 23.278,15.122 24.325,15.122 25.451,13.995 25.451,12.049 29.875,7.625 33.675,7.625 v1(33.7,7.65) ; C16.2 46.825,17.325 47.935,18.435 U3.2 U3.1
  Bottom Layer w0.6: v1(35.9,16.215) 35.91,16.205 41.901,16.205 42.874,17.178 43.628,17.178 C24.2 ; C24.2@43.75,17.3 R9.2 C16.2
NetC20_1: C20.1 C21.2 R6.1 R10.1 TP6.1 U1.15 U4.1 U4.2 | length 33.4
  Top Layer w0.5: v1(38.025,20) 43.017,20 45.892,17.125 v1(48.3,17.125)
  Bottom Layer w0.5: R6.1 32.295,15.875 32.625,16.205 U1.15 33.1,16.255 34.28,16.255 v1@38.006,19.981 ; v1(48.3,17.125) 48.375,17.05 R10.1 C20.1 49.925,17.075 51.12,18.27 U4.2 ; TP6.1 52.3,16.1 U4.2 ; C21.2 52.4,20 U4.1 U4.2
NetC22_2: C22.2 C23.1 L3.1 U1.12 | length 41.2
  Top Layer w0.4: v1(31.125,11.525) 31.125,10.85 C23.1 30.65,10.125 31.15,9.625 31.15,7.15 32.61,5.69 35.966,5.69 37.668,7.391 37.668,13.093 38.5,13.925 50.05,13.925 51.4,12.575 L3.1@54.925,12.575
  Top Layer w1: L3.1@54.75,12.675 55.75,13.675 L3.1
  Bottom Layer w0.5: v1(31.125,11.525) 31.144,11.544 31.144,12.269 C22.2
  Bottom Layer w0.6: C22.2 31.27,12.395 U1.12
NetC25_2: C25.2 U1.5 | length 4.6
  Bottom Layer w0.3: U1.5 38.65,12.245 39.88,12.245 41.65,10.475 41.9,10.475 C25.2
NetC26_2: C26.2 R5.1 R18.2 TP3.1 U1.16 | length 7.9
  Bottom Layer w0.5: R5.1 30.7,20.5 30.7,19.2 C26.2 30.725,18.975 R18.2 30.75,17.475 U1.16 ; R5.1@30.775,20.6 32.042,20.6 32.392,20.25 TP3.1
NetC27_2: C27.2 R24.2 R25.2 R26.2 T3.3 T4.3 TP13.1 | length 51.3
  Top Layer w1: R26.2@54.2,26.05 58.625,26.05 58.75,25.925 60.8,25.925 TP13.1
  Top Layer w1.2: v1@49.925,26.35 51.625,26.35 51.75,26.225 51.75,26.05 R26.2@54.2,26.05
  Bottom Layer w1.2: R24.2@46.633,26.65 R24.2@46.707,26.471 ; R24.2 46.975,26.475 C27.2 49.8,26.475 v1(49.85,26.425)
  Bottom Layer w1.3: T3.3@17.975,30.625 17.975,29.325 19.889,27.411 45.872,27.411 R24.2@46.633,26.65 ; v1(49.85,26.425) 51.65,28.225 T4.3
NetC28_2: C28.2 R24.1 U1.1 | length 13
  Bottom Layer w0.3: U1.1 41.8,17.475 46.975,22.65 46.975,24.925 R24.1
NetD1_1: D1.1 D3.2 T1.7 | length 14.6
  Top Layer w1: v2(26.5,48) 32.35,48 34.525,50.175 T1.7
  Bottom Layer w1: D1.1 D3.2 25.405,48.21 26.29,48.21 v2(26.5,48)
NetD2_1: D2.1 D4.2 T1.5 | length 9.9
  Top Layer w1: T1.5 43.365,51.875 46.34,54.85 v2(46.725,54.85)
  Bottom Layer w1: v2(46.725,54.85) 48.01,54.85 D4.2 D2.1
NetD5_2: D5.2 D9.1 T1.8 | length 10.6
  Top Layer w1: v2(27.3,54.625) 27.925,54.625 30.175,52.375 30.265,52.375 30.765,51.875 T1.8
  Bottom Layer w1: D5.2 D9.1 27.275,54.6 v2(27.3,54.625)
NetD6_2: D6.2 D10.1 T1.6 | length 13.8
  Top Layer w1: T1.6 39.605,50.295 39.685,50.295 40.105,49.875 40.105,49.795 42.075,47.825 46.275,47.825 v2(46.3,47.8)
  Bottom Layer w1: v2(46.3,47.8) 46.635,48.135 47.486,48.135 47.77,48.135 D6.2 48.11,45.475 D10.1
NetD7_2: D7.2 R1.2 | length 2.1
  Top Layer w1: R1.2 3,19.075 D7.2
NetD8_2: D8.2 R2.2 | length 2.2
  Top Layer w1: R2.2 71.5,17.1 71.575,17.025 D8.2@71.625,17.025
NetD13_1: D13.1 R8.1 | length 1.9
  Top Layer w1: D13.1 19.875,15.925 20.575,16.625 v1(20.65,16.625)
  Bottom Layer w0.6: v1(20.65,16.625) R8.1
NetD13_2: D13.2 T2.3 | length 2.1
  Top Layer w1: v1(18.85,13.775) D13.2@19.775,13.775
  Bottom Layer w1: T2.3@18.85,12.6 v1(18.85,13.775)
NetFB1_2: FB1.2 P1.17 P1.18 | length 5
  Top Layer w1: FB1.2 13.376,3.95 P1.17
NetFB2_2: FB2.2 P1.1 P1.2 | length 5.4
  Top Layer w1: P1.2 P1.1 FB2.2
NetP1_7: P1.7 R27.2 | length 9.2
  Top Layer w0.5: v3(43.279,9.025) 43.279,8.046 v3(44.679,6.646)
  Bottom Layer w0.5: R27.2 R27.2 43.277,9.027 v3(43.279,9.025) ; P1.7 43.64,5.608 v3(44.679,6.646)
NetR11_1: R11.1 R14.2 T2.1 | length 3.1
  Bottom Layer w0.3: T2.1 23.95,13.425 R11.1
NetR12_1: R12.1 U2.7 | length 18.9
  Top Layer w0.3: v1(28,24.125) 37.525,24.125 38.75,22.9 v1(40.325,22.9)
  Bottom Layer w0.3: R12.1 23.95,24.125 v1(28,24.125) ; U2.7 40.044,23.1 40.244,22.9 v1(40.325,22.9)
NetR12_2: R12.2 R20.2 T3.1 TP7.1 | length 12.6
  Top Layer w0.3: TP7.1 22.121,27.021 v1(22.121,29.6)
  Bottom Layer w0.3: TP7.1 21.75,24.2 21.75,22.375 R20.2 ; T3.1 T3.1@22.65,30.9
  Bottom Layer w0.5: v1(22.121,29.6) 22.121,29.627 22.35,29.856 22.35,30.6 T3.1@22.65,30.9
NetR13_1: R13.1 U2.5 | length 17.7
  Top Layer w0.3: v1(40.075,24.475) 40.156,24.475 40.606,24.025 49.824,24.025 v1(50.15,24.35)
  Bottom Layer w0.3: U2.5 39.919,24.4 39.994,24.475 v1(40.075,24.475) ; v1(50.15,24.35) 50.7,24.35 53.76,27.41 54.171,27.41 54.421,27.66 R13.1@54.421,27.811
NetR13_2: R13.2 R19.2 T4.1 TP10.1 | length 6.4
  Bottom Layer w0.8: R13.2@56.225,27.875 T4.1@56.225,31.375
  Bottom Layer w1: T4.1@56.225,31.375 T4.1 58.241,31.4 TP10.1@58.85,32.009
NetR15_2: R15.2 U1.6 | length 2.4
  Bottom Layer w0.3: U1.6 39.525,11.125 40.475,10.175 R15.2
NetR16_1: R16.1 U1.9 | length 23.6
  Top Layer w0.3: v1(35.075,8.575) 35.075,20 36.1,21.025 43.675,21.025 v1(43.725,20.975)
  Bottom Layer w0.3: U1.9 35.065,8.585 v1(35.075,8.575) ; R16.1@43.475,21.925 43.725,21.675 v1(43.725,20.975)
NetR16_2: R16.2 R23.2 U2.2 | length 16.4
  Top Layer w0.3: v1(34.575,23.1) 35.806,21.869 44.394,21.869 v1(45.25,22.725)
  Bottom Layer w0.3: v1(34.575,23.1) U2.2 ; R23.2@41.9,23.5 43.45,23.5 44.571,23.5 45.25,22.821 v1(45.25,22.725)
NetR17_2: R17.2 R27.1 U1.4 | length 4.7
  Bottom Layer w0.5: U1.4 38.51,13.675 R17.2 41.712,13.662 41.712,12.187 R27.1
NetR21_1: R21.1 U1.10 | length 19.9
  Top Layer w0.3: v1(29.2,22.55) 33.475,22.55 34.422,21.603 34.422,10.151 34.357,10.086 34.357,9.882 v1(34.3,9.825)
  Bottom Layer w0.3: v1(29.2,22.55) 30.375,22.55 R21.1 ; U1.10 33.065,9.84 34.285,9.84 v1(34.3,9.825)
NetR21_2: R21.2 R22.2 U2.4 | length 5.4
  Bottom Layer w0.3: R21.2 32,22.625 R22.2 32.25,24.4 U2.4
VCC: C17.2 C19.1 C29.2 C30.2 L3.2 P1.8 P1.9 R3.1 R4.2 R5.2 T1.2 T1.3 U1.8 U1.11 U2.1 U2.6 U2.8 | length 126.3
  Top Layer w0.3: v1(41.072,24.968) 41.129,25.026 41.129,25.821 41.125,25.825 41.125,26.775
  Top Layer w0.4: v1(26.675,20.725) 26.675,27.475
  Top Layer w1: P1.9 P1.8 ; v1@38.95,6.975 38.95,9.7 C19.1
  Top Layer w1.3: R3.1 26.45,27.7 26.675,27.475 27.675,26.475 32.725,26.475 34.175,27.925 34.175,29.075 34.25,29.15 34.25,29.85 T1.2 ; T1.2@34.875,29.125 39.255,29.125 T1.3@39.578,29.448 ; T1.3 39.605,29.475 T1.3@39.578,29.448 ; R4.2 47.7,28.701 ; L3.2 60.75,16.425 61.6,17.275 61.85,17.275 63.825,19.25 63.825,26.675 61.799,28.701 47.7,28.701 ; T1.3@39.578,29.448 39.955,29.07 39.955,27.995 41.175,26.775 45.774,26.775 47.7,28.701
  Bottom Layer w0.3: U2.1 35.724,22.051 36.05,21.725 38.25,21.725 38.525,22 38.525,22.446 38.529,22.45 U2.8 38.98,22.45 39.605,21.825 40.65,21.825 40.925,22.1 40.925,22.125 41.15,22.35 41.15,23.75 ; U2.6 41.15,23.75 ; v1(41.072,24.968) 41.129,24.911 41.129,24.23 41.15,24.209 41.15,23.75
  Bottom Layer w0.4: v1@26.75,20.7 R5.2
  Bottom Layer w0.5: U1.11 34.575,11.125 37.115,8.585 U1.8
  Bottom Layer w1: C17.2@37.5,6.875 38.192,6.875 ; P1.9 38.56,6.585 ; v1@38.725,7.1 U1.8@38.725,8.385 ; v1(38.9,6.925) 43.325,6.925 48.4,12 59.775,12 v2(60.575,12.8)
pads on no net: P1.5 P1.6 P1.12 P1.13 P1.14

## Polygon pours and split planes (outlines as drawn)
GND on Bottom Layer "GND_L02_P010" (solid, pour order 10): 13.8,37.958 15.51,39.667 25.358,39.667 27.391,37.634 27.391,27.834 27.833,27.392 46.367,27.392 46.991,28.016 46.991,38.441 48.092,39.542 59.916,39.542 61.263,38.195 61.263,31.647 65.491,27.419 65.491,11.992 62.205,8.705 47.98,8.705 44.549,5.275 42.75,5.275 42.475,5 42.475,1.098 41.417,0.04 33.361,0.04 32.366,1.035 32.366,4.792 31.684,5.475 28.916,5.475 24.074,10.317 13.533,10.317 12.275,11.575 12.275,25.75 13.8,27.276
NetC4_2 on Bottom Layer "NETC4_2_L02_P003" (solid, pour order 3): 50.25,0.04 50.25,4.575 51.975,6.3 67.25,6.3 69.981,9.031 69.981,27.672 65.225,32.846 65.225,41.325 53.95,41.325 49.625,45.65 49.625,57.125 74.95,57.125 74.95,0.04
NetC1_2 on Bottom Layer "NETC1_2_L02_P000" (solid, pour order 0): 22.775,42.9 23.862,43.988 23.862,57.025 -0.019,57.025 -0.019,2.394 2.335,0.04 24.463,0.04 24.463,4.612 22.7,6.375 9.4,6.375 4.981,10.794 4.981,27.731 9.825,32.575 9.825,39.75 12.975,42.9
GND on Top Layer "GND_L01_P012" (solid, pour order 12): 13.793,37.966 15.502,39.675 25.35,39.675 27.384,37.641 27.384,27.841 27.825,27.4 46.359,27.4 46.984,28.024 46.984,38.449 48.084,39.55 59.909,39.55 61.256,38.203 61.256,31.655 65.484,27.427 65.484,11.999 62.197,8.713 47.972,8.713 44.534,5.275 42.775,5.275 42.475,4.975 42.475,1.048 41.468,0.04 33.31,0.04 32.359,0.992 32.359,4.8 31.676,5.483 28.909,5.483 24.066,10.325 13.525,10.325 12.267,11.583 12.267,25.758 13.793,27.284
NetC4_2 on Top Layer "NETC4_2_L01_P005" (solid, pour order 5): 50.265,0.04 50.265,4.59 51.9,6.225 67.275,6.225 69.981,8.931 69.981,27.65 65.24,32.808 65.24,41.375 53.825,41.375 49.64,45.56 49.64,57.175 74.965,57.175 74.965,0.04
NetC1_2 on Top Layer "NETC1_2_L01_P002" (solid, pour order 2): 22.725,42.875 23.868,44.017 23.868,56.838 -0.175,56.838 -0.175,2.5 2.285,0.04 24.468,0.04 24.468,4.607 22.625,6.45 9.355,6.45 4.981,10.824 4.981,27.751 9.85,32.62 9.85,39.795 12.93,42.875

## Silkscreen, mask and mechanical layers (free items; w line width, h text height)
Top Overlay:
  circle w0.013: c18.221,3.99 r0.55
  circle w0.013: c36.001,3.99 r0.55
  circle w0.013: c25.841,3.99 r0.55
  circle w0.013: c20.761,3.99 r0.55
  circle w0.013: c30.921,3.99 r0.55
  circle w0.013: c28.381,3.99 r0.55
  circle w0.013: c23.301,3.99 r0.55
  circle w0.013: c33.461,3.99 r0.55
  circle w0.013: c38.541,3.99 r0.55
  circle w0.013: c53.781,3.99 r0.55
  circle w0.013: c41.081,3.99 r0.55
  circle w0.013: c46.161,3.99 r0.55
  circle w0.013: c51.241,3.99 r0.55
  circle w0.013: c43.621,3.99 r0.55
  circle w0.013: c48.701,3.99 r0.55
  circle w0.013: c58.861,3.99 r0.55
  circle w0.013: c15.681,3.99 r0.55
  circle w0.013: c56.321,3.99 r0.55
Mechanical 1:
  lines w0.013: -0.019,5.04 ccw(c4.98,5.039) 4.981,0.04 69.981,0.04 ccw(c69.983,5.039) 74.981,5.04 74.981,52.04 ccw(c69.981,52.04) 69.981,57.04 4.981,57.04 ccw(c4.981,52.04) -0.019,52.04 -0.019,5.04
  lines w0.254: 36.17,44.399 37.846,44.399 37.846,55.88 36.17,55.88 36.17,44.399
Top 3D Body:
  region: 49.387,3.185 49.524,3.094 49.615,2.958 49.647,2.797 49.639,1.972 49.647,1.972 49.615,1.811 49.524,1.674 49.387,1.583 49.226,1.551 48.401,1.559 48.401,1.551 48.24,1.583 48.104,1.674 48.013,1.811 47.981,1.972 47.989,2.797 47.981,2.797 48.013,2.958 48.104,3.094 48.24,3.185 48.401,3.217 48.401,3.209 49.226,3.209 49.226,3.217
Bottom 3D Body:
  circle w0.013: c38.654,2.384 r0.825
  circle w0.013: c36.114,2.384 r0.825
  circle w0.013: c41.194,2.384 r0.825
  circle w0.013: c33.574,2.384 r0.825
  circle w0.013: c43.734,2.384 r0.825
  circle w0.013: c10.714,2.384 r0.825
  circle w0.013: c8.174,2.384 r0.825
  circle w0.013: c5.634,2.384 r0.825
  circle w0.013: c46.274,2.384 r0.825
  circle w0.013: c18.334,2.384 r0.825
  circle w0.013: c20.874,2.384 r0.825
  circle w0.013: c28.494,2.384 r0.825
  circle w0.013: c13.254,2.384 r0.825
  circle w0.013: c25.954,2.384 r0.825
  circle w0.013: c23.414,2.384 r0.825
  circle w0.013: c31.034,2.384 r0.825
  circle w0.013: c15.794,2.384 r0.825
  circle w0.013: c13.254,2.384 r0.825
  circle w0.013: c15.794,2.384 r0.825
  circle w0.013: c18.334,2.384 r0.825
  circle w0.013: c20.874,2.384 r0.825
  circle w0.013: c23.414,2.384 r0.825
  circle w0.013: c25.954,2.384 r0.825
  circle w0.013: c28.494,2.384 r0.825
  circle w0.013: c31.034,2.384 r0.825
  circle w0.013: c33.574,2.384 r0.825
  circle w0.013: c43.734,2.384 r0.825
  circle w0.013: c46.274,2.384 r0.825
  circle w0.013: c41.194,2.384 r0.825
  circle w0.013: c38.654,2.384 r0.825
  circle w0.013: c36.114,2.384 r0.825
  circle w0.013: c10.714,2.384 r0.825
  circle w0.013: c8.174,2.384 r0.825
  circle w0.013: c5.634,2.384 r0.825
  region: 49.387,3.185 49.524,3.094 49.615,2.958 49.647,2.797 49.639,1.972 49.647,1.972 49.615,1.811 49.524,1.674 49.387,1.583 49.226,1.551 48.401,1.559 48.401,1.551 48.24,1.583 48.104,1.674 48.013,1.811 47.981,1.972 47.989,2.797 47.981,2.797 48.013,2.958 48.104,3.094 48.24,3.185 48.401,3.217 48.401,3.209 49.226,3.209 49.226,3.217
Top Assembly:
  lines w0.013: -2.5,-0.009 -2.5,54.991 57.5,54.991 57.5,-0.009 -2.5,-0.009
Bottom Assembly:
  circle w0.013: c13.254,2.384 r0.825
  circle w0.013: c15.794,2.384 r0.825
  circle w0.013: c18.334,2.384 r0.825
  circle w0.013: c20.874,2.384 r0.825
  circle w0.013: c23.414,2.384 r0.825
  circle w0.013: c25.954,2.384 r0.825
  circle w0.013: c28.494,2.384 r0.825
  circle w0.013: c31.034,2.384 r0.825
  circle w0.013: c33.574,2.384 r0.825
  circle w0.013: c43.734,2.384 r0.825
  circle w0.013: c46.274,2.384 r0.825
  circle w0.013: c41.194,2.384 r0.825
  circle w0.013: c38.654,2.384 r0.825
  circle w0.013: c36.114,2.384 r0.825
  circle w0.013: c10.714,2.384 r0.825
  circle w0.013: c8.174,2.384 r0.825
  circle w0.013: c5.634,2.384 r0.825
  region: 49.387,3.185 49.524,3.094 49.615,2.958 49.647,2.797 49.639,1.972 49.647,1.972 49.615,1.811 49.524,1.674 49.387,1.583 49.226,1.551 48.401,1.559 48.401,1.551 48.24,1.583 48.104,1.674 48.013,1.811 47.981,1.972 47.989,2.797 47.981,2.797 48.013,2.958 48.104,3.094 48.24,3.185 48.401,3.217 48.401,3.209 49.226,3.209 49.226,3.217